# Altium PCB PCB1.PcbDoc (part 1 of 2)
Units mm, origin at the board's own origin, x right, y up, seen from the top; angles counter-clockwise.
Board outline 313.69 x 191.13 mm, 2 copper layers (Top Layer, Bottom Layer), stack 1.535 mm thick; 91 components, 77 nets, 316 pads, 51 vias.
Unrouted connection lines stored in the file: 30.
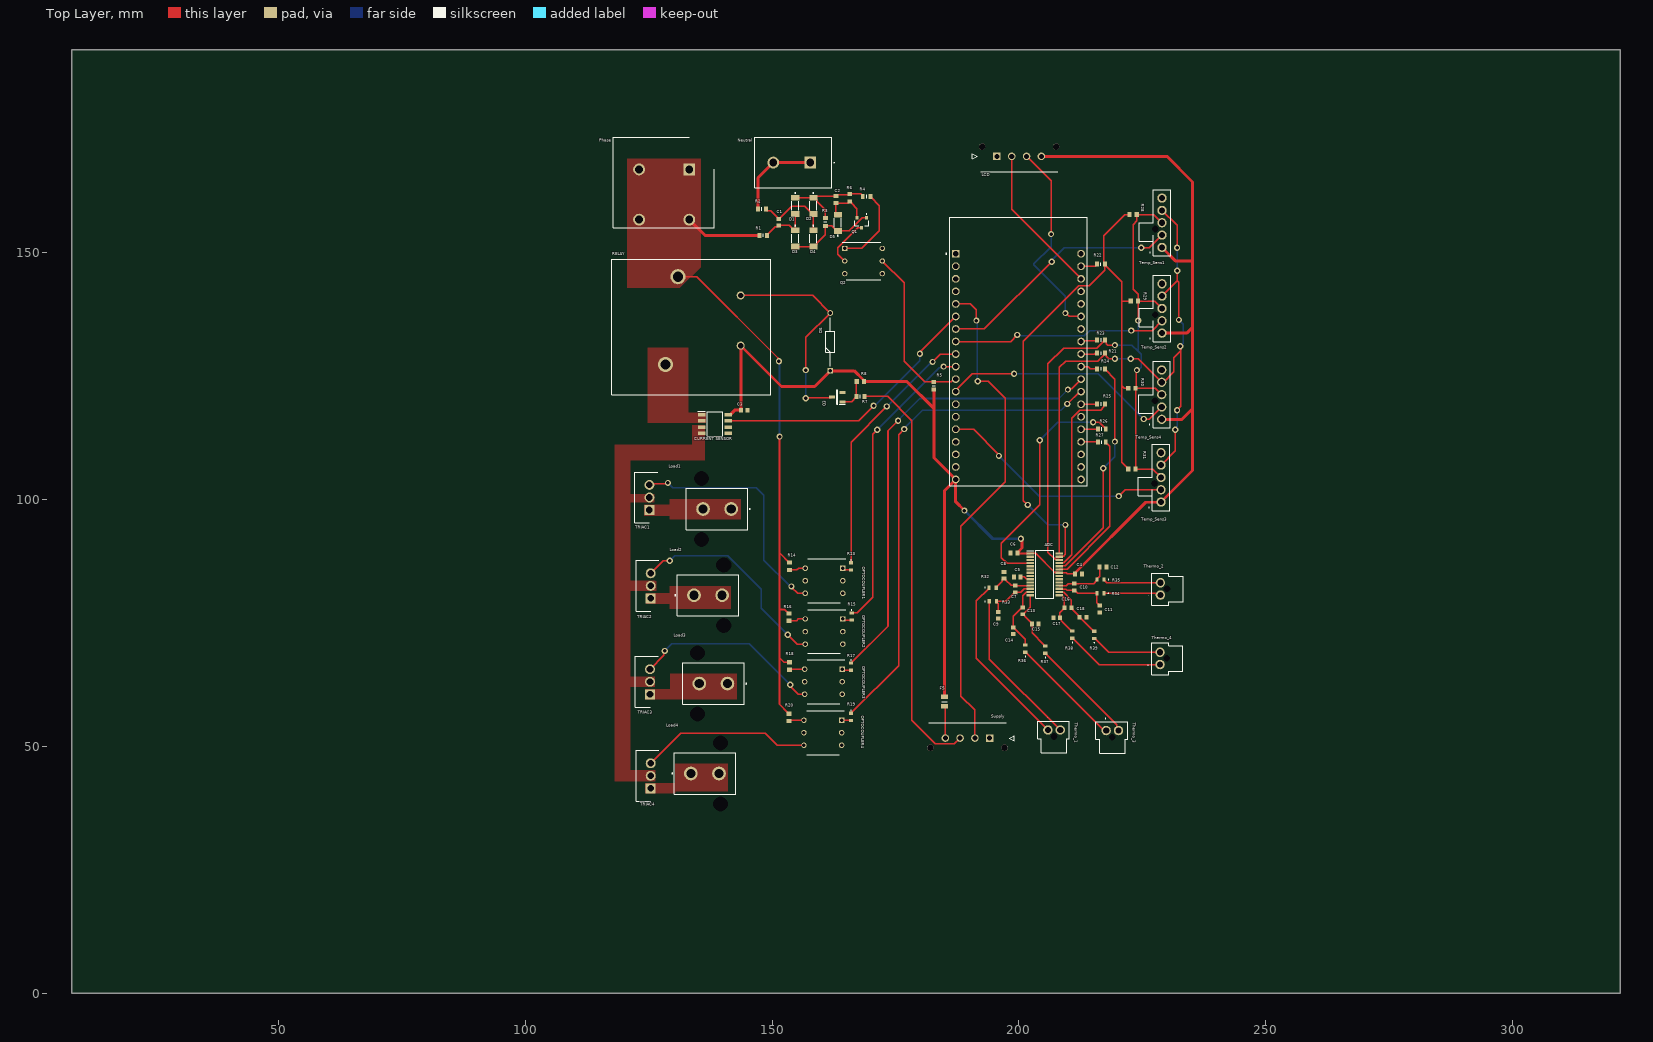
[diagram p0: Top Layer view]
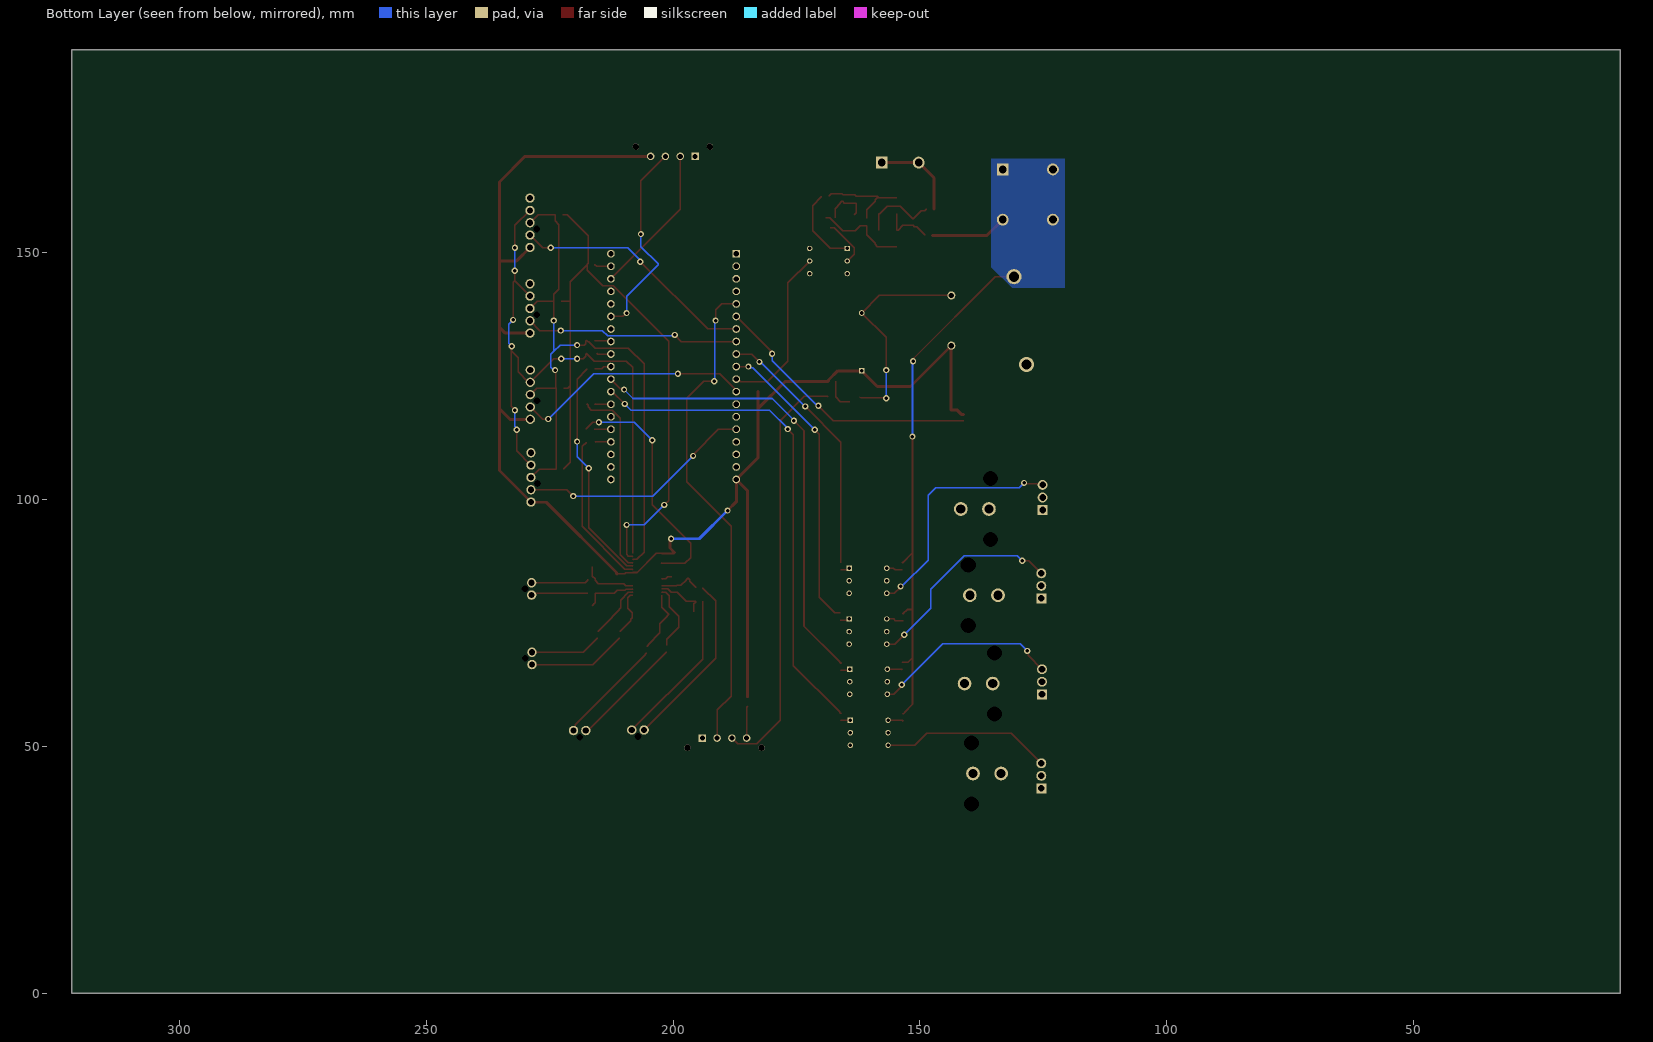
[diagram p1: Bottom Layer view, seen from below]

## Layer stack, top to bottom
Top Solder: solder mask 0.0102, Solder Resist, Dk 3.5
Top Layer: signal copper 0.035
Dielectric 2: prepreg 0.2, PP-006, Dk 4.6
Dielectric 1: core 1.065, FR-4, Dk 4.6
Dielectric 3: prepreg 0.2, PP-006, Dk 4.6
Bottom Layer: signal copper 0.035
Bottom Solder: solder mask 0.0102, Solder Resist, Dk 3.5

## Board outline
8.128,0 8.128,191.135 321.818,191.135 321.818,0

## Design rules (kind name [scope] priority, off if disabled: settings)
Clearance [All] p1: gap=0.2 ignorepadtopadclearanceinfootprint=FALSE except(0: Arc-Hole Track-Hole SMDPad-Hole THPad-Hole Via-Hole Fill-Hole Poly-Hole Region-Hole Text-Hole)
DiffPairsRouting [All] p1: maxlimit=1 minlimit=0.127 mostfreqgap=0.254 toplayer_minwidth=0.254 toplayer_maxwidth=0.381 toplayer_prefwidth=0.381 bottomlayer_minwidth=0.254 bottomlayer_maxwidth=0.381 bottomlayer_prefwidth=0.381 maxuncoupledlength=12.7
Height [All] p1: minheight=0 maxheight=35.4 prefheight=12.7
HoleSize [All] p1: absolutevalues=TRUE maxlimit=6 minlimit=0.025 maxpercent=80.000 minpercent=20.000
MinimumSolderMaskSliver [All] p1: minsoldermaskwidth=0.1
PolygonConnect [All] p1: connectstyle=Direct reliefconductorwidth=0.254 reliefentries=4 polygonreliefangle="90 Angle" airgapwidth=0.254
RoutingVias [All] p1: holewidth=0.711 width=1.27 viastyle="Through Hole" minholewidth=0.15 minwidth=0.25 maxholewidth=0.711 maxwidth=1.27
SilkToSilkClearance [All] p1: silktosilkclearance=0.15
SilkToSolderMaskClearance [IsPad] p1: minsilkscreentomaskgap=0.15 clearancetoexposedcopper=TRUE
SolderMaskExpansion SolderMaskExpansion_Via [IsVia] p1: expansion=0.102 istentingtop=TRUE
SolderMaskExpansion [All] p2: expansion=0.038 istentingtop=FALSE
SupplyNets "Schematic Supply Nets_50" [InNet('Trigger1')] p1: voltage=0.000
SupplyNets "Schematic Supply Nets_49" [InNet('Load2')] p2: voltage=0.000
SupplyNets "Schematic Supply Nets_48" [InNet('Firing Pulse 2')] p3: voltage=0.000
SupplyNets "Schematic Supply Nets_47" [InNet('Thermocouple3+')] p4: voltage=0.000
SupplyNets "Schematic Supply Nets_46" [InNet('DRDY')] p5: voltage=0.000
SupplyNets "Schematic Supply Nets_45" [InNet('SDA')] p6: voltage=0.000
SupplyNets "Schematic Supply Nets_44" [InNet('Phase')] p7: voltage=0.000
SupplyNets "Schematic Supply Nets_43" [InNet('CS_1')] p8: voltage=0.000
SupplyNets "Schematic Supply Nets_42" [InNet('Zero Cross Detection')] p9: voltage=0.000
SupplyNets "Schematic Supply Nets_41" [InNet('Firing Pulse 3')] p10: voltage=0.000
SupplyNets "Schematic Supply Nets_40" [InNet('Thermocouple3_IN+')] p11: voltage=0.000
SupplyNets "Schematic Supply Nets_39" [InNet('Thermocouple1+')] p12: voltage=0.000
SupplyNets "Schematic Supply Nets_38" [InNet('GND')] p13: voltage=0.000
SupplyNets "Schematic Supply Nets_37" [InNet('Thermocouple1_IN+')] p14: voltage=0.000
SupplyNets "Schematic Supply Nets_36" [InNet('Thermocouple2-')] p15: voltage=0.000
SupplyNets "Schematic Supply Nets_35" [InNet('Load4')] p16: voltage=0.000
SupplyNets "Schematic Supply Nets_34" [InNet('Phase_Out')] p17: voltage=0.000
SupplyNets "Schematic Supply Nets_33" [InNet('Thermocouple1_IN-')] p18: voltage=0.000
SupplyNets "Schematic Supply Nets_32" [InNet('DOUT')] p19: voltage=0.000
SupplyNets "Schematic Supply Nets_31" [InNet('Thermocouple4_IN+')] p20: voltage=0.000
SupplyNets "Schematic Supply Nets_30" [InNet('Thermocouple4_IN-')] p21: voltage=0.000
SupplyNets "Schematic Supply Nets_29" [InNet('Thermocouple2_IN-')] p22: voltage=0.000
SupplyNets "Schematic Supply Nets_28" [InNet('Firing Pulse 1')] p23: voltage=0.000
SupplyNets "Schematic Supply Nets_27" [InNet('Thermocouple3-')] p24: voltage=0.000
SupplyNets "Schematic Supply Nets_26" [InNet('Thermocouple3_IN-')] p25: voltage=0.000
SupplyNets "Schematic Supply Nets_25" [InNet('Thermocouple2+')] p26: voltage=0.000
SupplyNets "Schematic Supply Nets_24" [InNet('CS_ADC')] p27: voltage=0.000
SupplyNets "Schematic Supply Nets_23" [InNet('Neutral')] p28: voltage=0.000
SupplyNets "Schematic Supply Nets_22" [InNet('Trigger2')] p29: voltage=0.000
SupplyNets "Schematic Supply Nets_21" [InNet('SCLK')] p30: voltage=0.000
SupplyNets "Schematic Supply Nets_20" [InNet('Current Detection')] p31: voltage=0.000
SupplyNets "Schematic Supply Nets_19" [InNet('Thermocouple1-')] p32: voltage=0.000
SupplyNets "Schematic Supply Nets_18" [InNet('CS_3')] p33: voltage=0.000
SupplyNets "Schematic Supply Nets_17" [InNet('Relay_Trigger')] p34: voltage=0.000
SupplyNets "Schematic Supply Nets_16" [InNet('RESET')] p35: voltage=0.000
SupplyNets "Schematic Supply Nets_15" [InNet('Load1')] p36: voltage=0.000
SupplyNets "Schematic Supply Nets_14" [InNet('CS_2')] p37: voltage=0.000
SupplyNets "Schematic Supply Nets_13" [InNet('Thermocouple4-')] p38: voltage=0.000
SupplyNets "Schematic Supply Nets_12" [InNet('START')] p39: voltage=0.000
SupplyNets "Schematic Supply Nets_11" [InNet('Potentiometer')] p40: voltage=0.000
SupplyNets "Schematic Supply Nets_10" [InNet('CS_4')] p41: voltage=0.000
SupplyNets "Schematic Supply Nets_9" [InNet('Firing Pulse 4')] p42: voltage=0.000
SupplyNets "Schematic Supply Nets_8" [InNet('RELAY_OUT')] p43: voltage=0.000
SupplyNets "Schematic Supply Nets_7" [InNet('SCL')] p44: voltage=0.000
SupplyNets "Schematic Supply Nets_6" [InNet('+5')] p45: voltage=0.000
SupplyNets "Schematic Supply Nets_5" [InNet('Thermocouple4+')] p46: voltage=0.000
SupplyNets "Schematic Supply Nets_4" [InNet('DIN')] p47: voltage=0.000
SupplyNets "Schematic Supply Nets_3" [InNet('Thermocouple2_IN+')] p48: voltage=0.000
SupplyNets "Schematic Supply Nets_2" [InNet('Load3')] p49: voltage=0.000
SupplyNets "Schematic Supply Nets_1" [InNet('Trigger4')] p50: voltage=0.000
SupplyNets "Schematic Supply Nets" [InNet('Trigger3')] p51: voltage=0.000
Width [All] p1: maxlimit=6 minlimit=0.127 preferedwidth=0.254 minimp=50.000000 maximp=50.000000 favimp=50.000000
24 further rules are at their usual default settings.

## Classes and differential pairs
component class Sheet1: ADC C1 C2 C3 C4 C5 C6 C7 C8 C9 C10 C11 C12 C13 C14 C15 C16 C17 C18 "CURRENT SENSOR" D1 D2 D3 D4 D5 D6 F5 LCD Load1 Load2 Load3 Load4 Neutral OPTOCOUPLER1 OPTOCOUPLER2 OPTOCOUPLER3 OPTOCOUPLER4 Phase Q1 Q2 Q3 R1 R2 R3 R4 R6 R7 R8 R13 R14 R15 R16 R17 R18 R19 R20 R21 R22 R23 R24 R25 R26 R27 R28 R29 R30 R31 R32 R33 R34 R35 R36 R37 R38 R39 RELAY Supply Temp_Sens1 Temp_Sens2 Temp_Sens3 Temp_Sens4 Thermo_1 Thermo_2 Thermo_3 Thermo_4

## Components (designator, comment, footprint, x,y, rotation, side; value= is the part's Value field where it differs from the comment)
ADC "ADS1148IPWR" SOP65P640X120-28N 205.249,84.862 r0 top
C1 "1n" CAPC1608X90N 151.384,156.21 r90 top
C2 "10u" CAPC1608X102N 162.941,160.782 r270 top
C3 "1u" CAPC1608X90N 144.399,118.11 r0 top
C4 "0.1u" CAPC1608X95N 212.09,84.963 r0 top
C5 "1u" CAPC1608X90N 199.644,84.328 r180 top
C6 "0.1u" CAPC1608X95N 199.009,89.154 r180 top
C7 "10n" CAPC1608X87N 199.263,81.915 r270 top
C8 "1n" CAPC1608X90N 196.977,84.709 r90 top
C9 "1n" CAPC1608X90N 195.834,76.581 r270 top
C10 "10n" CAPC1608X87N 211.201,82.296 r90 top
C11 "1n" CAPC1608X90N 216.408,77.851 r270 top
C12 "1n" CAPC1608X90N 217.043,86.36 r0 top
C13 "10n" CAPC1608X87N 200.787,77.47 r270 top
C14 "1n" CAPC1608X90N 198.882,73.406 r270 top
C15 "1n" CAPC1608X90N 203.327,74.803 r0 top
C16 "10n" CAPC1608X87N 209.931,78.105 r0 top
C17 "1n" CAPC1608X90N 207.645,76.073 r180 top
C18 "1n" CAPC1608X90N 212.979,76.2 r0 top
"CURRENT SENSOR" "MCS1803GS-05-P" SOIC127P600X175-8N 138.43,115.316 r0 top
D1 "FDLL4148" FDLL4448 154.686,159.512 r270 top
D2 "FDLL4148" FDLL4448 158.369,159.512 r270 top
D3 "FDLL4148" FDLL4448 154.686,152.908 r270 top
D4 "FDLL4148" FDLL4448 158.369,152.908 r270 top
D5 "FDLL4148" FDLL4448 163.322,156.082 r90 top
D6 "1N4148,133" DIOAD1165W56L425D185 161.798,126.095 r90 top
F5 "1A" FUSC2012X55N 184.912,59.101 r270 top
LCD "43650-0417" 43650-04YY_151617 195.549,169.545 r180 top
Load1 "76829-0002" 768290002 141.717,98.1 r90 top
Load2 "76829-0002" 768290002 134.183,80.627 r270 top
Load3 "76829-0002" 768290002 140.955,62.738 r90 top
Load4 "76829-0002" 768290002 133.548,44.524 r270 top
Neutral "TB004-750-02GR" TB00475002GR 157.741,168.275 r180 top
OPTOCOUPLER1 "MOC3073M" DIP762W51P254L851H508Q6N 160.528,83.566 r180 top
OPTOCOUPLER2 "MOC3073M" DIP762W51P254L851H508Q6N 160.528,73.279 r180 top
OPTOCOUPLER3 "MOC3073M" DIP762W51P254L851H508Q6N 160.401,63.119 r180 top
OPTOCOUPLER4 "MOC3073M" DIP762W51P254L851H508Q6N 160.274,52.782 r180 top
Phase "VP026584000AG" SHDR4W100P1016_2X2_2032X1830X2850P 133.223,166.878 r180 top
Q1 "BC847,215" BC847215 168.148,156.083 r180 top
Q2 "4N35" DIP762W50P254L712H450Q6N 168.529,148.336 r0 top
Q3 "NVR4003NT3G" SOT96P237X111-3N 163.195,120.777 r180 top
R1 "220K" RESC1608X55N 148.209,153.543 r0 top
R2 "220K" RESC1608X55N 147.955,158.877 r0 top
R3 "47K" RESC1608X55N 160.782,156.248 r270 top
R4 "1K" RESC1608X55N 169.164,161.417 r0 top
R5 "4.7K" RESC1608X55N 182.753,123.063 r90 top
R6 "10K" RESC1608X50N 165.735,161.163 r270 top
R7 "1K" RESC1608X55N 167.894,120.904 r180 top
R8 "10K" RESC1608X50N 167.894,123.952 r180 top
R13 "200" ERA3AEB101V 165.989,86.487 r270 top
R14 "120" RESC1608X50N 153.543,86.499 r90 top
R15 "200" ERA3AEB101V 166.116,76.327 r270 top
R16 "120" RESC1608X50N 153.416,76.2 r90 top
R17 "200" ERA3AEB101V 165.989,66.167 r270 top
R18 "120" RESC1608X50N 153.543,66.294 r90 top
R19 "200" ERA3AEB101V 165.989,56.007 r270 top
R20 "120" RESC1608X50N 153.416,55.88 r90 top
R21 "47" RESC1608X55N 216.662,129.667 r0 top
R22 "47" RESC1608X55N 216.624,147.701 r0 top
R23 "47" RESC1608X55N 216.662,132.334 r0 top
R24 "47" RESC1608X55N 216.662,126.492 r0 top
R25 "47" RESC1608X55N 216.662,119.38 r0 top
R26 "47" RESC1608X55N 216.789,114.3 r0 top
R27 "47" RESC1608X55N 216.789,111.633 r0 top
R28 "10K" RESC1608X50N 223.139,157.734 r180 top
R29 "10K" RESC1608X50N 223.393,140.208 r180 top
R30 "10K" RESC1608X50N 222.885,122.555 r180 top
R31 "10K" RESC1608X50N 222.885,106.172 r180 top
R32 "4.12K" ERJP03_PA3_(0603) 194.691,82.169 r0 top
R33 "4.12K" ERJP03_PA3_(0603) 194.728,79.375 r0 top
R34 "4.12K" ERJP03_PA3_(0603) 216.535,81.026 r180 top
R35 "4.12K" ERJP03_PA3_(0603) 216.535,83.82 r180 top
R36 "4.12K" ERJP03_PA3_(0603) 201.295,69.813 r90 top
R37 "4.12K" ERJP03_PA3_(0603) 205.359,69.596 r90 top
R38 "4.12K" ERJP03_PA3_(0603) 210.82,72.644 r90 top
R39 "4.12K" ERJP03_PA3_(0603) 215.265,72.607 r90 top
RELAY "PR27-5V-S-900-1A-EF" RELAY_PR27-5V-S-900-1A-EF 128.397,127.381 r270 top
Supply "43650-0417" 43650-04YY_151617 194.087,51.689 r0 top
Temp_Sens1 "105309-1105" 1053091105 228.981,151.083 r90 top
Temp_Sens2 "105309-1105" 1053091105 228.981,133.724 r90 top
Temp_Sens3 "105309-1105" 1053091105 228.797,99.501 r90 top
Temp_Sens4 "105309-1105" 1053091105 228.924,116.265 r90 top
Thermo_1 "105309-1102" 1053091102 205.867,53.34 r0 top
Thermo_2 "105309-1102" 1053091102 228.657,80.665 r90 top
Thermo_3 "105309-1102" 1053091102 217.678,53.213 r0 top
Thermo_4 "105309-1102" 1053091102 228.6,66.588 r90 top
TRIAC1 "BT139X-800,127" TO254P460X1000X1910-3P 125.151,97.899 r90 top
TRIAC2 "BT139X-800,127" TO254P460X1000X1910-3P 125.405,79.992 r90 top
TRIAC3 "BT139X-800,127" TO254P460X1000X1910-3P 125.278,60.561 r90 top
TRIAC4 "BT139X-800,127" TO254P460X1000X1910-3P 125.405,41.511 r90 top
? "ESP32-DEVKITC-32D" MODULE_ESP32-DEVKITC-32D 199.898,130.048 r0 top

## Footprints (in the part's own frame and the unit in brackets; to place one, negate y for a bottom-side part, rotate by r counter-clockwise, add the part's x,y. Pads: shape width x height; smd on the part's side, far side on the other; paste and mask are expansions set on the pad)
43650-04YY_151617 [mm]
  rect 1.52x1.52 hole 1.02: 1(0,0)
  round 1.52 hole 1.02: 2(-3,0) 3(-6,0) 4(-9,0)
  round 1.27 hole 1.27 unplated: 5(3,-1.96) 6(-12,-1.96)
  silkscreen extent -12.32,-0.5 5,3.1, body extent -12.21,-2.46 3.44,3.15, height 9.77
768290002 [mm]
  round 2.775 hole 1.85: 1(0,0) 2(0,5.7)
  round 1.525 hole 3.05 unplated: MH1(-6.17,6.025) MH2(6.17,6.025)
  silkscreen extent -4.18,-3.9 4.18,9.09, body extent -7.7,-3.21 7.7,10.82, height 14.67
1053091102 [mm]
  round 1.9 hole 1.25: 1(0,0) 2(2.5,0)
  round 0.675 hole 1.35 unplated: 3(1.25,-1.34)
  silkscreen extent -2.08,-4.6 4.37,2.48, body extent -1.66,-4.6 4.28,1.74, height 10.47
1053091105 [mm]
  round 1.875 hole 1.25: 1(0,0) 2(2.5,0) 3(5,0) 4(7.5,0) 5(10,0)
  round 0.675 hole 1.35 unplated: MH1(3.75,1.34)
  silkscreen extent -1.72,-1.74 11.72,4.6, body extent -1.72,-4.6 11.72,1.74, height 10.39
BC847215 [mm]
  rect 0.6x0.7 smd: 1(-0.95,-1) 2(0.95,-1) 3(0,1)
  silkscreen extent -1.45,-1.8 1.45,0.65, body extent -1.45,-1.2 1.45,1.2, height 0.95
CAPC1608X87N [mm]
  rect 0.78x0.98 smd: 1(-0.7,0) 2(0.7,0)
  body extent -0.87,-0.48 0.88,0.47, height 0.87
CAPC1608X90N [mm]
  rect 0.81x0.94 smd: 1(-0.67,0) 2(0.67,0)
  body extent -0.8,-0.4 0.8,0.4, height 0.9
CAPC1608X95N [mm]
  rect 0.78x0.98 smd: 1(-0.7,0) 2(0.7,0)
  body extent -0.87,-0.48 0.88,0.47, height 0.87
CAPC1608X102N [mm]
  rect 0.82x1.02 smd: 1(-0.7,0) 2(0.7,0)
  body extent -0.8,-0.4 0.8,0.4, height 1.02
DIOAD1165W56L425D185 [mm]
  rect 1.15x1.15 hole 0.75: 1(0,0)
  round 1.15 hole 0.75: 2(11.7,0)
  silkscreen extent 0.92,-0.92 10.78,0.92, body extent 0.96,1.69 2.67,3.39, height 32.04
DIP762W50P254L712H450Q6N [mm]
  rect 1.1x1.1 hole 0.7: 1(-3.81,2.54)
  round 1.1 hole 0.7: 2(-3.81,0) 3(-3.81,-2.54) 4(3.81,-2.54) 5(3.81,0) 6(3.81,2.54)
  silkscreen extent -4.36,-3.81 3.5,3.81, body extent -3.94,-3.56 3.94,3.56, height 4.5
DIP762W51P254L851H508Q6N [mm]
  rect 1.11x1.11 hole 0.71: 1(-3.81,-2.54)
  round 1.11 hole 0.71: 2(-3.81,0) 3(-3.81,2.54) 4(3.81,2.54) 5(3.81,0) 6(3.81,-2.54)
  silkscreen extent -4.37,-4.45 3.3,4.45, body extent -3.94,-4.26 3.94,4.26, height 5.08
ERA3AEB101V [mm]
  rect 0.65x0.9 smd: 1(-0.725,0) 2(0.725,0)
  silkscreen extent -1.35,-0.05 -1.25,0.05, body extent -0.8,-0.4 0.8,0.4, height 0.45
ERJP03_PA3_(0603) [mm]
  rect 0.65x0.9 smd: 1(-0.725,0) 2(0.725,0)
  silkscreen extent -1.62,-0.05 -1.53,0.05, body extent -0.8,-0.4 0.8,0.4, height 0.45
FDLL4448 [mm]
  rect 1.15x1.65 smd: 1(-1.65,0) 2(1.65,0)
  silkscreen extent -2.7,-0.7 0.9,0.7, body extent -1.88,-0.74 1.72,0.74, height 1.5
FUSC2012X55N [mm]
  rect 0.89x1.42 smd: 1(-0.97,0) 2(0.97,0)
  silkscreen extent 0,-0.53 0,0.53, body extent -1,-0.63 1,0.63, height 0.55
MODULE_ESP32-DEVKITC-32D [mm]
  rect 1.56x1.56 / inner round 1.56 / far side rect 1.56x1.56 hole 1.04: J2-1(-12.7,19.76)
  round 1.56 hole 1.04: J2-2(-12.7,17.22) J2-3(-12.7,14.68) J2-4(-12.7,12.14) J2-5(-12.7,9.6) J2-6(-12.7,7.06) J2-7(-12.7,4.52) J2-8(-12.7,1.98) J2-9(-12.7,-0.56) J2-10(-12.7,-3.1) J2-11(-12.7,-5.64) J2-12(-12.7,-8.18) J2-13(-12.7,-10.72) J2-14(-12.7,-13.26) J2-15(-12.7,-15.8) J2-16(-12.7,-18.34) J2-17(-12.7,-20.88) J2-18(-12.7,-23.42) J2-19(-12.7,-25.96) J3-1(12.7,19.76) J3-2(12.7,17.22) J3-3(12.7,14.68) J3-4(12.7,12.14) J3-5(12.7,9.6) J3-6(12.7,7.06) J3-7(12.7,4.52) J3-8(12.7,1.98) J3-9(12.7,-0.56) J3-10(12.7,-3.1) J3-11(12.7,-5.64) J3-12(12.7,-8.18) J3-13(12.7,-10.72) J3-14(12.7,-13.26) J3-15(12.7,-15.8) J3-16(12.7,-18.34) J3-17(12.7,-20.88) J3-18(12.7,-23.42) J3-19(12.7,-25.96)
  silkscreen extent -14.7,-27.25 13.95,27.15, body extent -13.97,-27.9 13.97,27.2, height 6.69
RELAY_PR27-5V-S-900-1A-EF [mm]
  round 1.635 hole 1.09: COIL1(-13.97,15.24) COIL2(-3.81,15.24)
  round 3.076 hole 2.06: COM(-17.78,2.54) NO(0,0)
  silkscreen extent -21.3,-10.92 6.1,21.31
RESC1608X50N [mm]
  rect 0.85x1 smd: 1(-0.75,0) 2(0.75,0)
  body extent -0.77,-0.43 0.78,0.42, height 0.45
RESC1608X55N [mm]
  rect 0.8x1 smd: 1(-0.8,0) 2(0.8,0)
  silkscreen extent 0,-0.33 0,0.33, body extent -0.77,-0.42 0.78,0.43, height 0.45
SHDR4W100P1016_2X2_2032X1830X2850P [mm]
  rect 2.4x2.4 hole 1.6: 1(0,0)
  round 2.4 hole 1.6: 2(0,10.16) 3(10.16,0) 4(10.16,10.16)
  silkscreen extent -5.08,-6.54 15.39,11.76, body extent -5.08,-6.54 15.24,11.76, height 28.5
SOIC127P600X175-8N [mm]
  rect 1.525x0.7 smd: 1(-2.712,1.905) 2(-2.712,0.635) 3(-2.712,-0.635) 4(-2.712,-1.905) 5(2.712,-1.905) 6(2.712,-0.635) 7(2.712,0.635) 8(2.712,1.905)
  silkscreen extent -3.47,-2.45 1.6,2.61, body extent -3,-2.45 3,2.45, height 1.75
SOP65P640X120-28N [mm]
  rect 1.475x0.45 smd: 1(-2.938,4.225) 2(-2.938,3.575) 3(-2.938,2.925) 4(-2.938,2.275) 5(-2.938,1.625) 6(-2.938,0.975) 7(-2.938,0.325) 8(-2.938,-0.325) 9(-2.938,-0.975) 10(-2.938,-1.625) 11(-2.938,-2.275) 12(-2.938,-2.925) 13(-2.938,-3.575) 14(-2.938,-4.225) 15(2.938,-4.225) 16(2.938,-3.575) 17(2.938,-2.925) 18(2.938,-2.275) 19(2.938,-1.625) 20(2.938,-0.975) 21(2.938,-0.325) 22(2.938,0.325) 23(2.938,0.975) 24(2.938,1.625) 25(2.938,2.275) 26(2.938,2.925) 27(2.938,3.575) 28(2.938,4.225)
  silkscreen extent -3.67,-4.85 1.85,4.85, body extent -3.2,-4.85 3.2,4.85, height 1.13
SOT96P237X111-3N [mm]
  rect 1.25x0.6 smd: 1(-1.05,0.955) 2(-1.05,-0.955) 3(1.05,0)
  silkscreen extent -1.68,-1.46 0.08,1.51, body extent -1.18,-1.46 1.18,1.46, height 1.11
TB00475002GR [mm]
  rect 2.4x2.4 hole 1.6: 1(0,0)
  round 2.4 hole 1.6: 2(7.5,0)
  silkscreen extent -4.9,-5.1 11.25,5.1, body extent -4.35,-5.1 11.25,5.1, height 14.6
TO254P460X1000X1910-3P [mm]
  rect 2.01x2.01 hole 1.34: 1(0,0)
  round 2.01 hole 1.34: 2(2.54,0) 3(5.08,0)
  silkscreen extent -2.61,-1.65 7.69,2.95, body extent -2.46,-1.65 7.54,2.95, height 18.54

## Part data
ADC: "Integrated Circuit", Manufacturer_Name="Texas Instruments", Mouser Part Number=595-ADS1148IPWR, Arrow Part Number=ADS1148IPWR, Arrow Price/Stock=https://www.arrow.com/en/products/ads1148ipwr/texas-instruments, Datasheet Link=https://www.ti.com/lit/ds/symlink/ads1148.pdf?ts=1619426241250&ref_url=https%253A%252F%252Fwww.ti.com%252Fstore%252Fti%252Fen%252Fp%252Fproduct%252F%253Fp%253DADS1148IPWR, Height=1.2mm, Manufacturer_Part_Number=ADS1148IPWR, Mouser Price/Stock=https://www.mouser.co.uk/ProductDetail/Texas-Instruments/ADS1148IPWR?qs=J7dbQ%252BTwiys0xPZTIiVXvA%3D%3D
C1 C8 C9 C11 C12 C14 C15 C17 C18: library part GRM188R72E102KW07D, "Capacitor", Manufacturer_Name="Murata Electronics", Mouser Part Number=81-GRM18R72E102KW07D, Arrow Part Number=GRM188R72E102KW07D, Arrow Price/Stock=https://www.arrow.com/en/products/grm188r72e102kw07d/murata-manufacturing, Datasheet Link=https://search.murata.co.jp/Ceramy/image/img/A01X/G101/ENG/GRM188R72E102KW07-00B.pdf, Height=0.9mm, Manufacturer_Part_Number=GRM188R72E102KW07D, Mouser Price/Stock=https://www.mouser.co.uk/ProductDetail/Murata-Electronics/GRM188R72E102KW07D?qs=0EDxBdtd5TTqBbAL3ZuZjw%3D%3D
C2: library part 0603YD106KAT2A, "Capacitor", Manufacturer_Name="Kyocera AVX", Mouser Part Number=581-0603YD106KAT2A, Datasheet Link=https://www.mouser.at/datasheet/2/40/cx5r-776519.pdf, Height=1.02mm, Manufacturer_Part_Number=0603YD106KAT2A, Mouser Price/Stock=https://www.mouser.co.uk/ProductDetail/KYOCERA-AVX/0603YD106KAT2A?qs=%252BdQmOuGyFcHR%252BKJjw6cgxw%3D%3D
C3 C5: library part MSASE168SB7105KTNA01, "Capacitor", Manufacturer_Name="TAIYO YUDEN", Mouser Part Number=963-MSASE168SB7105KT, Datasheet Link=https://ds.yuden.co.jp/TYCOMPAS/or/specSheet?pn=MSASE168SB7105KTNA01, Height=0.9mm, Manufacturer_Part_Number=MSASE168SB7105KTNA01, Mouser Price/Stock=https://www.mouser.co.uk/ProductDetail/TAIYO-YUDEN/MSASE168SB7105KTNA01?qs=tlsG%2FOw5FFh5ATmmYVDecQ%3D%3D
C4 C6: library part C0603C104K5RAC3121, "Capacitor", Manufacturer_Name=KEMET, Mouser Part Number=80-C603C104K5RAC3121, Arrow Part Number=C0603C104K5RAC3121, Arrow Price/Stock=https://www.arrow.com/en/products/c0603c104k5rac3121/kemet-corporation?region=nac, Datasheet Link=https://mouser.componentsearchengine.com/Datasheets/1/C0603C104K5RAC3121.pdf, Height=0.95mm, Manufacturer_Part_Number=C0603C104K5RAC3121, Mouser Price/Stock=https://www.mouser.co.uk/ProductDetail/KEMET/C0603C104K5RAC3121?qs=oBCMsStVSxe1EkGyoyETtg%3D%3D
C7 C10 C13 C16: library part C0603C103K5RAC7013, "Capacitor", Manufacturer_Name=KEMET, Mouser Part Number=80-C0603C103K5RC7013, Arrow Part Number=C0603C103K5RAC7013, Arrow Price/Stock=https://www.arrow.com/en/products/c0603c103k5rac7013/kemet-corporation, Datasheet Link=https://www.mouser.es/datasheet/2/212/KEM_C1002_X7R_SMD-1102033.pdf, Height=0.87mm, Manufacturer_Part_Number=C0603C103K5RAC7013, Mouser Price/Stock=https://www.mouser.co.uk/ProductDetail/KEMET/C0603C103K5RAC7013?qs=rxL5I1UrDR%2FDLdVRYcoJRw%3D%3D
"CURRENT SENSOR": "Integrated Circuit", Manufacturer_Name="Monolithic Power Systems (MPS)", Mouser Part Number=946-MCS1803GS-05-P, Datasheet Link=https://www.monolithicpower.com/en/documentview/productdocument/index/version/2/document_type/Datasheet/lang/en/sku/MCS1803GS/document_id/5067/, Height=1.75mm, Manufacturer_Part_Number=MCS1803GS-05-P, Mouser Price/Stock=https://www.mouser.co.uk/ProductDetail/Monolithic-Power-Systems-MPS/MCS1803GS-05-P?qs=GedFDFLaBXFKS0RaHM78Vw%3D%3D
D1 D2 D3 D4 D5: "Diode", Manufacturer_Name=onsemi, Mouser Part Number=512-FDLL4148, Arrow Part Number=FDLL4148, Arrow Price/Stock=https://www.arrow.com/en/products/fdll4148/on-semiconductor?utm_currency=USD&region=europe, Datasheet Link=https://www.onsemi.com/pub/Collateral/1N914-D.PDF, Height=1mm, Manufacturer_Part_Number=FDLL4148, Mouser Price/Stock=https://www.mouser.co.uk/ProductDetail/onsemi-Fairchild/FDLL4148?qs=GXJjH%252BIVz3Nb7%252BJnJig0Zw%3D%3D
D6: "Diode", Manufacturer_Name=Nexperia, Mouser Part Number=771-1N4148,133, Arrow Part Number=1N4148,133, Arrow Price/Stock=https://www.arrow.com/en/products/1n4148133/nxp-semiconductors, Datasheet Link=https://assets.nexperia.com/documents/data-sheet/1N4148_1N4448.pdf, Manufacturer_Part_Number=1N4148,133, Mouser Price/Stock=https://www.mouser.co.uk/ProductDetail/Nexperia/1N4148133?qs=elmhQ6eFu7hy8ApvpFxPZg%3D%3D
F5: library part MFU0805FF00500P100, "Fuse", Manufacturer_Name=Vishay, Mouser Part Number=594-MFU0805FF00500P1, Arrow Part Number=MFU0805FF00500P100, Arrow Price/Stock=https://www.arrow.com/en/products/mfu0805ff00500p100/vishay?region=nac, Datasheet Link=https://componentsearchengine.com/Datasheets/2/MFU0805FF00500P100.pdf, Height=0.55mm, Manufacturer_Part_Number=MFU0805FF00500P100, Mouser Price/Stock=https://www.mouser.co.uk/ProductDetail/Vishay-Beyschlag/MFU0805FF00500P100?qs=oI046glRuru%2F1tLHYz8V8Q%3D%3D
LCD Supply: "Connector", Manufacturer_Name=Molex, Mouser Part Number=538-43650-0417, Datasheet Link=https://www.molex.com/pdm_docs/sd/436500215_sd.pdf, Height=9.9mm, Manufacturer_Part_Number=43650-0417, Mouser Price/Stock=https://www.mouser.co.uk/ProductDetail/Molex/43650-0417?qs=HSGlLeu24BPtyyP0ZyQMkg%3D%3D
Load1 Load2 Load3 Load4: "Connector", Manufacturer_Name=Molex, Mouser Part Number=538-76829-0002, Datasheet Link=https://www.molex.com/pdm_docs/sd/768290002_sd.pdf, Height=14.8mm, Manufacturer_Part_Number=76829-0002, Mouser Price/Stock=https://www.mouser.co.uk/ProductDetail/Molex/76829-0002?qs=KpdAywxU013zSYApMD1zRg%3D%3D
Neutral: "Connector", Manufacturer_Name="Same Sky", Mouser Part Number=179-TB004-750-02GR, Datasheet Link=https://www.sameskydevices.com/product/resource/tb004-750.pdf?srsltid=AfmBOoqxp3TGb86M5ULA4E0wzZ60u_8h9TMDVLcLcvBMs9Tl5jQU3eIt, Height=14.5mm, Manufacturer_Part_Number=TB004-750-02GR, Mouser Price/Stock=https://www.mouser.co.uk/ProductDetail/Same-Sky/TB004-750-02GR?qs=%252BXxaIXUDbq2vyEQ2cptGkg%3D%3D
OPTOCOUPLER1 OPTOCOUPLER2 OPTOCOUPLER3 OPTOCOUPLER4: "Phototransistor", Manufacturer_Name=onsemi, Mouser Part Number=863-MOC3073M, Arrow Part Number=MOC3073M, Arrow Price/Stock=https://www.arrow.com/en/products/moc3073m/on-semiconductor, Datasheet Link=https://www.onsemi.com/pub/Collateral/MOC3072M-D.PDF, Height=5.08mm, Manufacturer_Part_Number=MOC3073M, Mouser Price/Stock=https://www.mouser.co.uk/ProductDetail/onsemi/MOC3073M?qs=y6ZabgHbY%252Byfe0V2Rxk3CA%3D%3D
Phase: "Connector", Manufacturer_Name=Amphenol, Mouser Part Number=523-VP026584000AG, Datasheet Link=http://www.anytek.com.tw/UserUpFiles/20181025/d41_CP3hmn_a.pdf, Height=28.5mm, Manufacturer_Part_Number=VP026584000AG, Mouser Price/Stock=https://www.mouser.co.uk/ProductDetail/Amphenol-Anytek/VP026584000AG?qs=T3oQrply3y8ZXElTBVt2Rg%3D%3D
Q1: "Transistor BJT NPN", Manufacturer_Name=Nexperia, Mouser Part Number=771-BC847215, Arrow Part Number=BC847,215, Arrow Price/Stock=https://www.arrow.com/en/products/bc847215/nexperia?region=europe, Datasheet Link=https://assets.nexperia.com/documents/data-sheet/BC847_SER.pdf, Height=1.1mm, Manufacturer_Part_Number=BC847,215, Mouser Price/Stock=https://www.mouser.co.uk/ProductDetail/Nexperia/BC847215?qs=me8TqzrmIYWROhdFmDauyQ%3D%3D
Q2: "Transistor", Manufacturer_Name=Isocom, Arrow Part Number=4N35, Arrow Price/Stock=https://www.arrow.com/en/products/4n35/isocom?region=nac, Datasheet Link=http://uk.rs-online.com/web/p/products/597302, Height=4.5mm, Manufacturer_Part_Number=4N35
Q3: "MOSFET (N-Channel)", Manufacturer_Name=onsemi, Mouser Part Number=863-NVR4003NT3G, Arrow Part Number=NVR4003NT3G, Arrow Price/Stock=https://www.arrow.com/en/products/nvr4003nt3g/on-semiconductor?region=nac, Datasheet Link=https://www.onsemi.com/pub/Collateral/NTR4003N-D.PDF, Height=1.11mm, Manufacturer_Part_Number=NVR4003NT3G, Mouser Price/Stock=https://www.mouser.co.uk/ProductDetail/onsemi/NVR4003NT3G?qs=3PKVEWFFm28eDxDv809Sag%3D%3D
R1 R2: library part MCT06030C2203FP500, "Resistor", Manufacturer_Name=Vishay, Mouser Part Number=594-MCT06030C2203FP5, Arrow Part Number=MCT06030C2203FP500, Arrow Price/Stock=https://www.arrow.com/en/products/mct06030c2203fp500/vishay?region=nac, Datasheet Link=http://www.vishay.com/docs/28705/mcx0x0xpro.pdf, Height=0.55mm, Manufacturer_Part_Number=MCT06030C2203FP500, Mouser Price/Stock=https://www.mouser.co.uk/ProductDetail/Vishay-Beyschlag/MCT06030C2203FP500?qs=sIxod1zg5hFqr3QuK7fi7g%3D%3D
R3: library part KTR03EZPF4702, "Resistor", Manufacturer_Name="ROHM Semiconductor", Mouser Part Number=755-KTR03EZPF4702, Datasheet Link=http://rohmfs.rohm.com/en/products/databook/datasheet/passive/resistor/chip_resistor/ktr.pdf, Height=0.55mm, Manufacturer_Part_Number=KTR03EZPF4702, Mouser Price/Stock=https://www.mouser.com/Search/Refine.aspx?Keyword=755-KTR03EZPF4702
R4 R7: library part CR0603-JW-102ELF, "Resistor", Manufacturer_Name=Bourns, Mouser Part Number=652-CR0603-JW-102ELF, Arrow Part Number=CR0603-JW-102ELF, Arrow Price/Stock=https://www.arrow.com/en/products/cr0603-jw-102elf/bourns?region=nac, Datasheet Link=https://www.bourns.com/pdfs/chpreztr.pdf, Height=0.55mm, Manufacturer_Part_Number=CR0603-JW-102ELF, Mouser Price/Stock=https://www.mouser.co.uk/ProductDetail/Bourns/CR0603-JW-102ELF?qs=rcPhh2wube3o3zlmFZCUPg%3D%3D
R5: library part ESR03EZPF4701, "Resistor", Manufacturer_Name="ROHM Semiconductor", Mouser Part Number=755-ESR03EZPF4701, Datasheet Link=http://uk.rs-online.com/web/p/products/1674382, Height=0.55mm, Manufacturer_Part_Number=ESR03EZPF4701, Mouser Price/Stock=https://www.mouser.co.uk/ProductDetail/ROHM-Semiconductor/ESR03EZPF4701?qs=493kPxzlxfL2NnaeJoZB2Q%3D%3D
R6 R8 R28 R29 R30 R31: library part CRCW060310K0FKEA, "Resistor", Manufacturer_Name=Vishay, Mouser Part Number=71-CRCW0603-10K-E3, Arrow Part Number=CRCW060310K0FKEA, Arrow Price/Stock=https://www.arrow.com/en/products/crcw060310k0fkea/vishay?region=nac, Datasheet Link=http://www.vishay.com/docs/20035/dcrcwe3.pdf, Height=0.5mm, Manufacturer_Part_Number=CRCW060310K0FKEA, Mouser Price/Stock=https://www.mouser.co.uk/ProductDetail/Vishay-Dale/CRCW060310K0FKEA?qs=pAO1Z172M84BVnhDjtnsoQ%3D%3D
R13 R15 R17 R19: library part ERA-3AEB201V, "Resistor", Manufacturer_Name=Panasonic, Mouser Part Number=667-ERA-3AEB201V, Arrow Part Number=ERA-3AEB201V, Arrow Price/Stock=https://www.arrow.com/en/products/era-3aeb201v/panasonic, Datasheet Link=https://industrial.panasonic.com/cdbs/www-data/pdf/RDM0000/AOA0000C307.pdf, Height=0.55mm, Manufacturer_Part_Number=ERA-3AEB201V, Mouser Price/Stock=https://www.mouser.co.uk/ProductDetail/Panasonic/ERA-3AEB201V?qs=XhO1W%252B5LdJ8wKRfVTWbMaA%3D%3D
R14 R16 R18 R20: library part CRCW0603120RJNEB, "Resistor", Manufacturer_Name=Vishay, Mouser Part Number=71-CRCW0603120RJNEB, Arrow Part Number=CRCW0603120RJNEB, Arrow Price/Stock=https://www.arrow.com/en/products/crcw0603120rjneb/vishay?region=nac, Datasheet Link=http://www.vishay.com/docs/20035/dcrcwe3.pdf, Height=0.5mm, Manufacturer_Part_Number=CRCW0603120RJNEB, Mouser Price/Stock=https://www.mouser.co.uk/ProductDetail/Vishay-Dale/CRCW0603120RJNEB?qs=dDPdN3Fizmtr%252Bd8kOFNKdA%3D%3D
R21 R22 R23 R24 R25 R26 R27: library part MCT06030C4709FP500, "Resistor", Manufacturer_Name=Vishay, Mouser Part Number=594-MCT06030C4709FP5, Datasheet Link=http://www.vishay.com/docs/28705/mcx0x0xpro.pdf, Height=0.55mm, Manufacturer_Part_Number=MCT06030C4709FP500, Mouser Price/Stock=https://www.mouser.co.uk/ProductDetail/Vishay-Beyschlag/MCT06030C4709FP500?qs=Vqeyrh6s%2FtGOVFMn1BdPQw%3D%3D
R32 R33 R34 R35 R36 R37 R38 R39: library part ERJ-PA3F4121V, "Resistor", Manufacturer_Name=Panasonic, Mouser Part Number=667-ERJ-PA3F4121V, Datasheet Link=https://industrial.panasonic.com/cdbs/www-data/pdf/RDO0000/AOA0000C331.pdf, Height=0.55mm, Manufacturer_Part_Number=ERJ-PA3F4121V, Mouser Price/Stock=https://www.mouser.com/Search/Refine.aspx?Keyword=667-ERJ-PA3F4121V
RELAY: Package=None, Availability=Unavailable, MP=PR27-5V-S-900-1A-EF, Price=None
Temp_Sens1 Temp_Sens2 Temp_Sens3 Temp_Sens4: "Connector", Manufacturer_Name=Molex, Mouser Part Number=538-105309-1105, Datasheet Link=https://componentsearchengine.com/Datasheets/1/105309-1105.pdf, Height=10.71mm, Manufacturer_Part_Number=105309-1105, Mouser Price/Stock=https://www.mouser.co.uk/ProductDetail/Molex/105309-1105?qs=5aG0NVq1C4xeVnIB0kAHNg%3D%3D
Thermo_1 Thermo_2 Thermo_3 Thermo_4: "Connector", Manufacturer_Name=Molex, Mouser Part Number=538-105309-1102, Datasheet Link=http://www.molex.com/pdm_docs/sd/1053091102_sd.pdf, Height=10.51mm, Manufacturer_Part_Number=105309-1102, Mouser Price/Stock=https://www.mouser.co.uk/ProductDetail/Molex/105309-1102?qs=5aG0NVq1C4zzTOxEjLJqtg%3D%3D
TRIAC1 TRIAC2 TRIAC3 TRIAC4: "Thermistor", Manufacturer_Name="WeEn Semiconductors", Mouser Part Number=771-BT139X-800127, Arrow Part Number=BT139X-800,127, Arrow Price/Stock=https://www.arrow.com/en/products/bt139x-800127/ween-semiconductors?utm_currency=USD&region=europe, Datasheet Link=https://www.mouser.co.uk/datasheet/2/848/BT139X-800-1104332.pdf, Height=4.6mm, Manufacturer_Part_Number=BT139X-800,127, Mouser Price/Stock=https://www.mouser.co.uk/ProductDetail/WeEn-Semiconductors/BT139X-800127?qs=me8TqzrmIYUpGZ3R%252BN0ixA%3D%3D
?: "WiFi Development Tools (802.11) ESP32 General Development Kit, ESP32-WROOM-32D on the board", Package=None, Check_prices=https://www.snapeda.com/parts/ESP32-DEVKITC-32D/Espressif+Systems/view-part/?ref=eda, MF="Espressif Systems", MP=ESP32-DEVKITC-32D, SnapEDA_Link=https://www.snapeda.com/parts/ESP32-DEVKITC-32D/Espressif+Systems/view-part/?ref=snap

## Via types
v1: diameter 1.27, hole 0.711, Top Layer to Bottom Layer, tented both sides, 51 vias

## Nets (pads, with @x,y where several pads share a name; then routed paths per layer and width w, separated by ;. In a path a pad name is that pad's centre, name@x,y a point inside that pad or via, vN(x,y) a via of type N, cw(c..) or ccw(c..) an arc to the next point about the centre after c; other vN are vias at no path point)
+5: "CURRENT SENSOR.8" ?.J2-19 ADC.1 ADC.22 C3.1 C4.1 C6.1 D6.1 F5.1 LCD.4 R5.1 R8.1 RELAY.COIL2 Temp_Sens1.1 Temp_Sens2.1 Temp_Sens3.1 Temp_Sens4.1 | length 310.3
  Top Layer w0.35: C6.1@199.709,89.254 C6.1 199.776,89.087 ADC.1 202.336,89.112 203.419,89.112 207.294,85.237 208.137,85.237 ADC.22 209.58,85.187 209.804,84.963 C4.1
  Top Layer w0.6: 141.142,117.221 141.554,117.221 141.605,117.271 141.605,117.291 142.424,118.11 C3.1 143.683,118.156 RELAY.COIL2@143.683,131.145 ; RELAY.COIL2 RELAY.COIL2@143.683,131.145 ; R5.1@182.753,121.92 182.753,118.491 ; F5.1 184.912,101.802 ?.J2-19 ; v1(188.976,97.79) 187.198,99.568 ?.J2-19 ; C6.1@199.709,89.254 200.648,90.193 200.648,91.652 200.406,91.894 v1(200.406,92.075) ; LCD.4 229.997,169.545 235.178,164.364 235.178,148.382 ; C4.1 211.48,85.053 211.48,85.24 225.707,99.467 Temp_Sens3.1@228.763,99.467 ; Temp_Sens3.1 235.178,105.882 235.178,118.41 ; Temp_Sens4.1 233.033,116.265 235.178,118.41 ; Temp_Sens2.1 233.982,133.724 235.178,134.92 ; Temp_Sens1.1 231.682,148.382 235.178,148.382 ; RELAY.COIL2@143.683,131.145 151.892,122.936 158.623,122.936 161.507,125.82 161.523,125.82 D6.1 166.633,126.095 168.519,124.209 168.519,124.077 R8.1 177.292,123.952 182.753,118.491 ; 182.753,118.491 182.753,108.533 ?.J2-19 ; 235.178,118.41 235.178,134.92 ; 235.178,134.92 235.178,148.382
  Bottom Layer w0.6: v1(188.976,97.79) 194.691,92.075 v1(200.406,92.075)
CS_1: ?.J2-7 Temp_Sens1.2 | length 49.8
  Top Layer w0.254: ?.J2-7 192.988,134.568 v1(206.629,148.209) ; v1(224.79,151.003) 226.401,151.003 Temp_Sens1.2
  Bottom Layer w0.254: v1(206.629,148.209) 206.629,148.463 209.169,151.003 v1(224.79,151.003)
CS_2: ?.J2-8 Temp_Sens2.2 | length 43.4
  Top Layer w0.254: ?.J2-8 198.322,132.028 v1(199.644,133.35) ; v1@223.012,134.239 226.996,134.239 Temp_Sens2.2
  Bottom Layer w0.254: v1(199.644,133.35) 199.771,133.223 213.286,133.223 214.302,134.239 v1(222.758,134.239)
CS_3: ?.J2-15 Temp_Sens3.2 | length 47.9
  Top Layer w0.254: ?.J2-15 187.236,114.211 190.843,114.211 195.961,109.093 v1(195.961,108.839) ; v1(220.218,100.711) 221.508,102.001 Temp_Sens3.2
  Bottom Layer w0.254: v1(195.961,108.839) 204.089,100.711 v1(220.218,100.711)
CS_4: ?.J2-12 Temp_Sens4.2 | length 48.3
  Top Layer w0.254: ?.J2-12 187.198,122.174 190.539,125.515 198.97,125.515 v1(199.009,125.476) ; v1(225.298,116.332) 225.348,116.282 226.441,116.282 Temp_Sens4.2
  Bottom Layer w0.254: v1(199.009,125.476) 199.048,125.515 216.115,125.515 v1(225.298,116.332)
CS_ADC: ADC.24 R24.2 | length 46.1
  Top Layer w0.254: ADC.24 208.285,86.585 209.394,86.585 217.106,94.297 v1(217.106,106.362) ; R24.2 217.462,126.392 219.456,124.398 v1(219.456,111.76)
  Bottom Layer w0.254: v1(217.106,106.362) 219.456,108.712 v1(219.456,111.76)
"Current Detection": "CURRENT SENSOR.7" ?.J2-6 | length 55.8
  Top Layer w0.254: 141.142,115.951 167.513,115.951 v1(170.561,118.999) ; v1(179.959,129.54) 179.959,129.815 180.259,130.115 180.259,130.169 ?.J2-6
  Bottom Layer w0.254: v1(170.561,118.999) 170.815,118.999 179.959,128.143 v1(179.959,129.54)
DIN: ADC.27 R22.2 R28.2 R29.2 R30.2 R31.2 | length 133.3
  Top Layer w0.254: v1(201.803,98.933) 200.914,99.822 200.914,132.07 212.139,143.295 214.21,143.295 217.424,146.509 R22.2@217.424,147.601 ; ADC.27 208.285,88.535 209.06,88.535 209.423,88.898 v1(209.423,94.869) ; R31.2 222.135,106.247 220.853,107.529 220.853,123.063 ; R30.2 221.361,122.555 220.853,123.063 ; R28.2 221.488,157.734 217.208,153.454 217.208,147.917 R22.2 R22.2@217.424,147.601 ; R29.2 220.853,140.208 ; R22.2@217.424,147.601 220.853,144.172 220.853,140.208 ; 220.853,123.063 220.853,140.208
  Bottom Layer w0.254: v1(201.803,98.933) 205.867,94.869 v1(209.423,94.869)
DOUT: ADC.26 R23.2 R28.1 R29.1 R30.1 R31.1 Temp_Sens1.3 Temp_Sens2.3 Temp_Sens3.3 Temp_Sens4.3 | length 138.8
  Top Layer w0.254: ADC.26 208.089,87.885 207.314,87.885 205.867,89.332 205.867,127.508 209.035,130.676 215.804,130.676 217.089,131.961 217.189,131.961 217.462,132.234 R23.2 217.735,132.061 217.735,131.553 217.97,131.318 v1(219.456,131.318) ; v1(223.901,126.238) 223.774,126.111 223.774,122.694 R30.1 ; v1(224.155,136.271) 224.155,140.196 R29.1 ; Temp_Sens3.3 227.126,106.172 R31.1 R30.1 ; Temp_Sens4.3 227.634,122.555 R30.1 ; Temp_Sens2.3 227.497,140.208 R29.1 ; Temp_Sens1.3 227.33,157.734 R28.1 223.889,156.452 223.139,155.702 223.139,142.621 224.143,141.617 R29.1
  Bottom Layer w0.254: v1(219.456,131.318) 222.885,131.318 224.155,130.048 ; v1(223.901,126.238) 224.176,126.238 224.79,126.852 224.79,129.413 224.155,130.048 ; v1(224.155,136.271) 224.155,130.048
DRDY: ADC.25 R25.2 | length 39
  Top Layer w0.254: ADC.25 208.285,87.235 209.06,87.235 210.693,88.868 210.693,116.449 212.371,118.127 216.552,118.127 217.189,118.764 217.189,119.107 R25.2
"Firing Pulse 1": ?.J2-9 R13.1 | length 53
  Top Layer w0.254: R13.1 165.989,111.633 v1(173.228,118.872) ; v1(182.499,127.889) 184.098,129.488 ?.J2-9
  Bottom Layer w0.254: v1(173.228,118.872) 173.355,118.872 182.372,127.889 v1(182.499,127.889)
"Firing Pulse 2": ?.J2-10 R15.1 | length 61.1
  Top Layer w0.254: R15.1 167.222,77.052 170.434,80.264 170.434,113.284 v1(171.323,114.173) ; v1(184.733,126.948) ?.J2-10
  Bottom Layer w0.254: v1(171.323,114.173) 183.904,126.754 184.539,126.754 v1(184.733,126.948)
"Firing Pulse 3": ?.J3-11 R17.1 | length 93.7
  Top Layer w0.35: R17.1 166.114,66.892 166.264,67.042 166.264,67.167 173.482,74.385 173.482,113.919 v1(175.514,115.951) ; v1(209.931,122.301) 210.107,122.477 210.667,122.477 ?.J3-11
  Bottom Layer w0.35: v1(175.514,115.951) 175.514,116.078 179.919,120.483 208.113,120.483 v1(209.931,122.301)
"Firing Pulse 4": ?.J3-12 R19.1 | length 101.1
  Top Layer w0.35: R19.1 166.114,56.732 166.264,56.882 166.264,57.007 175.641,66.384 175.641,113.157 v1(176.784,114.3) ; v1(209.804,119.38) 212.292,121.868 ?.J3-12
  Bottom Layer w0.35: v1(176.784,114.3) 176.784,114.427 180.467,118.11 208.534,118.11 v1(209.804,119.38)
GND: "CURRENT SENSOR.5" ?.J2-14 ADC.2 ADC.3 ADC.6 ADC.10 ADC.21 C3.2 C4.2 C5.2 C6.2 C8.2 C9.2 C11.2 C12.2 C14.2 C15.2 C17.2 C18.2 LCD.1 OPTOCOUPLER1.2 OPTOCOUPLER2.2 OPTOCOUPLER3.2 OPTOCOUPLER4.2 Q2.4 Q3.2 Supply.1 Temp_Sens1.5 Temp_Sens2.5 Temp_Sens3.5 Temp_Sens4.5
Load1: Load1.1 Load1.2 TRIAC1.1
Load2: Load2.1 Load2.2 TRIAC2.1
Load3: Load3.1 Load3.2 TRIAC3.1
Load4: Load4.1 Load4.2 TRIAC4.1
Net_J3-2: ?.J3-2 R22.1 | length 3.5
  Top Layer w0.254: ?.J3-2 215.491,147.268 215.824,147.601 R22.1
Net_J3-8: ?.J3-8 R23.1 | length 3.3
  Top Layer w0.35: ?.J3-8 212.751,132.181 R23.1@215.862,132.181
Net_J3-9: ?.J3-9 R21.1 | length 3
  Top Layer w0.254: ?.J3-9 215.302,129.488 R21.1@215.481,129.667
Net_J3-10: ?.J3-10 R24.1 | length 3.5
  Top Layer w0.254: ?.J3-10 214.042,126.948 214.498,126.492 R24.1
Net_J3-13: ?.J3-13 R25.1 | length 3.3
  Top Layer w0.254: ?.J3-13 215.81,119.328 R25.1
Net_J3-15: ?.J3-15 R26.1 | length 3.4
  Top Layer w0.254: ?.J3-15 215.937,114.248 R26.1
Net_J3-16: ?.J3-16 R27.1 | length 3.2
  Top Layer w0.254: ?.J3-16 215.66,111.708 R27.1@215.735,111.633
NetADC_9: ADC.9 C5.1 | length 2.2
  Top Layer w0.254: C5.1 201.098,84.328 201.246,84.179 201.246,84.177 201.438,83.985 202.213,83.985 ADC.9
NetC1_1: C1.1 D1.2 D3.1 R1.2 | length 10.3
  Top Layer w0.254: R1.2 149.009,153.643 150.628,155.262 151.106,155.262 C1.1 153.454,155.54 154.436,154.558 D3.1 D1.2
NetC1_2: C1.2 D2.2 D4.1 R2.2 | length 15.5
  Top Layer w0.254: R2.2 148.755,158.777 149.028,158.504 149.695,158.504 151.319,156.88 C1.2 151.449,156.88 153.954,159.385 156.596,159.385 158.119,157.862 D2.2 D4.1
NetC2_1: C2.1 D1.1 D2.1 R3.1 R4.1 R6.1 | length 19.5
  Top Layer w0.254: D1.1 D2.1 ; R3.1 160.782,158.749 159.067,160.464 159.067,160.714 158.619,161.162 D2.1 ; R4.1 168.364,161.517 167.968,161.913 R6.1 165.587,161.765 164.602,161.765 163.224,161.765 C2.1 158.689,161.482 D2.1
NetC2_2: C2.2 D5.2 Q1.2 R6.2 | length 9.4
  Top Layer w0.254: D5.2 162.941,158.113 C2.2 165.329,160.082 165.66,160.413 R6.2 165.81,160.413 166.108,160.115 166.108,160.04 167.198,158.95 Q1.2
NetD3_2: D3.2 D4.2 D5.1 Q1.1 R3.2 | length 18.9
  Top Layer w0.254: D3.2 D4.2 158.619,151.258 159.067,151.706 159.067,151.956 160.782,153.671 R3.2 162.056,155.448 163.072,154.432 D5.1 165.659,154.432 168.31,157.083 Q1.1
NetD6_2: D6.2 Q3.3 RELAY.COIL1 | length 44.4
  Top Layer w0.254: RELAY.COIL1 158.242,141.351 D6.2 156.845,132.842 v1(156.845,126.238) ; v1(156.845,120.523) 156.972,120.65 162.018,120.65 Q3.3
  Bottom Layer w0.254: v1(156.845,120.523) v1(156.845,126.238)
NetF5_2: F5.2 Supply.4 | length 6.5
  Top Layer w0.254: F5.2 185.087,57.956 Supply.4
NetOPTOCOUPLER1_1: OPTOCOUPLER1.1 R13.2 | length 1.8
  Top Layer w0.254: OPTOCOUPLER1.1 164.682,85.762 R13.2
NetOPTOCOUPLER1_6: OPTOCOUPLER1.6 R14.1 | length 3.3
  Top Layer w0.254: R14.1 155.023,85.749 155.38,86.106 OPTOCOUPLER1.6
NetOPTOCOUPLER2_1: OPTOCOUPLER2.1 R15.2 | length 1.9
  Top Layer w0.254: OPTOCOUPLER2.1 164.555,75.602 R15.2
NetOPTOCOUPLER2_6: OPTOCOUPLER2.6 R16.1 | length 3.5
  Top Layer w0.254: R16.1 154.953,75.45 155.322,75.819 OPTOCOUPLER2.6
NetOPTOCOUPLER3_1: OPTOCOUPLER3.1 R17.2 | length 1.9
  Top Layer w0.35: OPTOCOUPLER3.1 164.428,65.442 R17.2
NetOPTOCOUPLER3_6: OPTOCOUPLER3.6 R18.1 | length 3.1
  Top Layer w0.254: R18.1 153.658,65.659 OPTOCOUPLER3.6
NetOPTOCOUPLER4_1: OPTOCOUPLER4.1 R19.2 | length 1.9
  Top Layer w0.35: OPTOCOUPLER4.1 164.124,55.282 R19.2
NetOPTOCOUPLER4_6: OPTOCOUPLER4.6 R20.1 | length 3.1
  Top Layer w0.254: R20.1 153.608,55.322 OPTOCOUPLER4.6
NetQ1_3: Q1.3 Q2.2 | length 9.8
  Top Layer w0.254: Q2.2 163.322,149.733 163.322,151.041 167.364,155.083 Q1.3
NetQ2_1: Q2.1 R4.2 | length 16.2
  Top Layer w0.254: Q2.1 168.148,150.876 171.704,154.432 171.704,159.577 169.964,161.317 R4.2
NetQ3_1: Q3.1 R7.2 R8.2 | length 6.4
  Top Layer w0.254: Q3.1 166.112,119.822 167.094,120.804 R7.2 167.094,123.875 R8.2@167.017,123.952
Neutral: Neutral.1 Neutral.2 R2.1 | length 18.2
  Top Layer w0.6: R2.1 147.155,165.189 Neutral.2 Neutral.1
Phase: Phase.1 Phase.2 Phase.3 Phase.4 R1.1 R14.2 R16.2 R18.2 R20.2 RELAY.COM | length 123.1
  Top Layer w0.354: RELAY.COM 134.747,145.161 151.209,128.699 151.209,128.191 v1(151.384,128.016) ; v1(151.511,112.776) 151.511,89.206 ; R20.2 153.341,56.63 153.093,56.878 153.093,56.953 151.511,58.535 151.511,67.945 ; R16.2 153.341,76.95 152.567,77.724 151.511,77.724 ; R18.2 152.412,67.044 151.511,67.945 ; R14.2 153.468,87.249 151.511,89.206 ; 151.511,67.945 151.511,77.724 ; 151.511,77.724 151.511,89.206
  Top Layer w0.6: Phase.2 136.398,153.543 R1.1
  Bottom Layer w0.354: v1(151.384,128.016) 151.511,127.889 v1(151.511,112.776)
Phase_Out: "CURRENT SENSOR.3" "CURRENT SENSOR.4" TRIAC1.2 TRIAC2.2 TRIAC3.2 TRIAC4.2
Potentiometer: ?.J2-5 Supply.2 | length 100
  Top Layer w0.254: ?.J2-5 190.171,139.648 191.389,138.43 v1(191.389,136.271) ; Supply.2@191.008,51.768 191.008,57.404 188.214,60.198 188.214,94.615 197.231,103.632 197.231,120.523 193.802,123.952 v1(191.643,123.952)
  Top Layer w0.6: Supply.2@191.008,51.768 Supply.2
  Bottom Layer w0.254: v1(191.389,136.271) 191.516,136.144 191.516,124.079 v1(191.643,123.952)
RELAY_OUT: "CURRENT SENSOR.1" "CURRENT SENSOR.2" RELAY.NO
Relay_Trigger: R7.1 Supply.3 | length 84.7
  Top Layer w0.254: R7.1 168.694,120.804 168.794,120.904 173.393,120.904 178.308,115.989 178.308,55.267 183.029,50.546 186.944,50.546 Supply.3
RESET: ADC.4 R26.2 | length 48.9
  Top Layer w0.254: ADC.4@202.409,87.235 ADC.4 197.597,87.137 196.469,88.265 196.469,91.186 204.216,98.933 v1(204.216,112.014) ; v1(215.011,115.697) 216.292,115.697 217.589,114.4 R26.2
  Bottom Layer w0.254: v1(204.216,112.014) 207.883,115.681 214.995,115.681 v1(215.011,115.697)
SCL: ?.J3-3 LCD.2 | length 30.6
  Top Layer w0.254: LCD.2 198.549,158.777 ?.J3-3
SCLK: ADC.28 R21.2 Temp_Sens1.4 Temp_Sens2.4 Temp_Sens3.4 Temp_Sens4.4 | length 130.8
  Top Layer w0.254: ADC.28 208.187,126.78 209.462,128.055 215.95,128.055 217.462,129.567 R21.2 217.735,129.394 217.735,129.013 218.224,128.524 v1(219.456,128.524) ; v1(222.631,128.524) 224.165,128.524 Temp_Sens4.4 229.302,123.765 231.394,125.857 231.394,128.723 232.791,130.12 ; Temp_Sens3.4 231.648,109.852 v1(231.648,114.173) ; Temp_Sens2.4 232.093,144.335 ; Temp_Sens1.4 232.029,155.535 v1(232.029,151.003) ; v1(232.029,118.11) 232.791,118.872 232.791,130.12 ; v1(232.093,146.368) 232.093,144.335 ; v1(232.41,136.398) 232.41,144.018 232.093,144.335 ; v1(232.664,131.064) 232.791,130.937 232.791,130.12
  Bottom Layer w0.254: v1(219.456,128.524) v1(222.631,128.524) ; v1(231.648,114.173) 231.648,114.448 232.029,114.829 v1(232.029,118.11) ; v1(232.029,151.003) 232.093,150.939 v1(232.093,146.368) 232.093,146.093 v1@232.328,146.093 ; v1(232.41,136.398) 233.299,135.509 233.299,131.699 v1(232.664,131.064)
SDA: ?.J3-6 LCD.3 | length 41.3
  Top Layer w0.254: LCD.3 206.502,164.592 v1(206.502,153.797) ; v1(209.423,137.795) 209.486,137.795 210.173,137.108 ?.J3-6
  Bottom Layer w0.254: v1(206.502,153.797) 206.502,151.257 203.051,147.806 203.051,147.596 209.423,141.224 v1(209.423,137.795)
START: ADC.23 R27.2 | length 31.3
  Top Layer w0.254: ADC.23 208.285,85.935 209.76,85.935 218.44,94.615 218.44,110.782 217.962,111.26 217.862,111.26 217.589,111.533 R27.2
Thermocouple1+: R32.1 Thermo_1.1 | length 35.9
  Top Layer w0.254: R32.1 193.966,82.044 191.389,79.467 191.389,67.818 Thermo_1.1
Thermocouple1-: R33.1 Thermo_1.2 | length 32
  Top Layer w0.254: R33.1 194.003,67.704 Thermo_1.2
Thermocouple1_IN+: ADC.11 C7.1 C8.1 R32.2 | length 8.5
  Top Layer w0.254: R32.2 195.416,82.294 196.634,83.512 196.634,83.761 196.912,84.039 197.042,84.039 197.32,83.761 197.32,83.696 198.401,82.615 C7.1 199.291,82.587 ADC.11
Thermocouple1_IN-: ADC.12 C7.2 C9.1 R33.2 | length 10.2
  Top Layer w0.254: C9.1 195.834,78.869 195.453,79.25 R33.2 197.323,79.375 199.163,81.215 C7.2 200.351,81.215 201.073,81.937 ADC.12
Thermocouple2+: R34.1 Thermo_2.1 | length 11.5
  Top Layer w0.254: R34.1 227.685,81.026 227.731,80.98 228.342,80.98 Thermo_2.1
Thermocouple2-: R35.1 Thermo_2.2 | length 11.7
  Top Layer w0.254: R35.1 217.26,83.695 217.79,83.165 Thermo_2.2
Thermocouple2_IN+: ADC.17 C10.1 C11.1 R34.2 | length 10.8
  Top Layer w0.254: ADC.17 208.285,81.839 209.517,81.839 209.76,81.596 211.301,81.596 211.871,81.026 R34.2 215.81,79.119 216.065,78.864 216.065,78.799 216.343,78.521 C11.1
Thermocouple2_IN-: ADC.18 C10.2 C12.1 R35.2 | length 11
  Top Layer w0.254: ADC.18 209.564,82.587 209.973,82.996 C10.2 215.111,82.996 215.81,83.695 R35.2 215.81,83.945 216.373,84.508 C12.1
Thermocouple3+: R36.1 Thermo_3.1 | length 23
  Top Layer w0.254: R36.1 201.42,69.088 217.295,53.213 Thermo_3.1
Thermocouple3-: R37.1 Thermo_3.2 | length 21.9
  Top Layer w0.254: R37.1 205.484,68.871 205.682,68.673 205.682,68.548 219.863,54.367 219.863,53.528 Thermo_3.2
Thermocouple3_IN+: ADC.13 C13.1 C14.1 R36.2 | length 13.7
  Top Layer w0.254: R36.2 201.295,71.728 198.947,74.076 C14.1 198.882,76.365 200.687,78.17 C13.1 200.787,80.538 201.438,81.189 202.213,81.189 ADC.13
Thermocouple3_IN-: ADC.14 C13.2 C15.1 R37.2 | length 12.9
  Top Layer w0.254: C13.2 C13.2@200.887,76.77 ; ADC.14 202.311,78.194 C13.2@200.887,76.77 ; R37.2 205.234,70.321 205.036,70.519 205.036,70.644 202.657,73.023 C15.1 202.657,74.868 201.15,76.375 201.15,76.507 C13.2@200.887,76.77
Thermocouple4+: R38.1 Thermo_4.1 | length 20
  Top Layer w0.254: R38.1 210.945,71.919 216.276,66.588 Thermo_4.1
Thermocouple4-: R39.1 Thermo_4.2 | length 14.5
  Top Layer w0.254: R39.1 215.39,71.882 218.184,69.088 Thermo_4.2
Thermocouple4_IN+: ADC.15 C16.1 C17.1 R38.2 | length 9.5
  Top Layer w0.254: ADC.15 208.7,80.637 209.231,80.106 C16.1 209.231,78.005 208.315,77.089 C17.1 208.593,75.795 208.593,75.471 210.695,73.369 R38.2
Thermocouple4_IN-: ADC.16 C16.2 C18.1 R39.2 | length 11.4
  Top Layer w0.254: ADC.16 208.285,81.189 209.06,81.189 210.631,79.618 C16.2 210.894,77.842 210.894,77.68 212.309,76.265 C18.1 212.309,76.135 212.587,75.857 212.615,75.857 215.14,73.332 R39.2
Trigger1: OPTOCOUPLER1.4 TRIAC1.3 | length 48.7
  Top Layer w0.254: TRIAC1.3 125.356,103.184 128.711,103.184 v1(128.905,103.378) ; v1(153.924,82.423) 153.924,82.296 155.194,81.026 OPTOCOUPLER1.4
  Bottom Layer w0.254: v1(128.905,103.378) 129.921,102.362 146.812,102.362 148.336,100.838 148.336,87.757 153.67,82.423 v1(153.924,82.423)
Trigger2: OPTOCOUPLER2.4 TRIAC2.3 | length 42.4
  Top Layer w0.254: TRIAC2.3 127.963,87.63 v1(129.286,87.63) ; v1(153.162,72.644) 155.067,70.739 OPTOCOUPLER2.4
  Bottom Layer w0.254: v1(129.286,87.63) 130.305,88.649 140.975,88.649 147.828,81.796 147.828,77.978 v1(153.162,72.644)
Trigger3: OPTOCOUPLER3.4 TRIAC3.3 | length 38.2
  Top Layer w0.254: TRIAC3.3 128.076,68.439 128.076,69.148 v1(128.27,69.342) ; v1(153.67,62.484) 153.67,62.23 155.321,60.579 OPTOCOUPLER3.4
  Bottom Layer w0.254: v1(128.27,69.342) 129.688,70.76 145.394,70.76 v1(153.67,62.484)
Trigger4: OPTOCOUPLER4.4 TRIAC4.3 | length 34.6
  Top Layer w0.254: TRIAC4.3 131.519,52.705 148.59,52.705 151.053,50.242 OPTOCOUPLER4.4
"Zero Cross Detection": ?.J2-11 Q2.5 R5.2 | length 34.6
  Top Layer w0.254: Q2.5 176.784,143.891 176.784,128.016 180.937,123.863 R5.2 182.753,123.838 186.275,123.838 186.845,124.408 ?.J2-11
pads on no net: "CURRENT SENSOR.6" ?.J2-1 ?.J2-2 ?.J2-3 ?.J2-4 ?.J2-13 ?.J2-16 ?.J2-17 ?.J2-18 ?.J3-1 ?.J3-4 ?.J3-5 ?.J3-7 ?.J3-14 ?.J3-17 ?.J3-18 ?.J3-19 ADC.5 ADC.7 ADC.8 ADC.19 ADC.20 LCD.5 LCD.6 Load1.MH1 Load1.MH2 Load2.MH1 Load2.MH2 Load3.MH1 Load3.MH2 Load4.MH1 Load4.MH2 OPTOCOUPLER1.3 OPTOCOUPLER1.5 OPTOCOUPLER2.3 OPTOCOUPLER2.5 OPTOCOUPLER3.3 OPTOCOUPLER3.5 OPTOCOUPLER4.3 OPTOCOUPLER4.5 Q2.3 Q2.6 Supply.5 Supply.6 Temp_Sens1.MH1 Temp_Sens2.MH1 Temp_Sens3.MH1 Temp_Sens4.MH1 Thermo_1.3 Thermo_2.3 Thermo_3.3 Thermo_4.3

## Polygon pours and split planes (outlines as drawn)
Load1 on Top Layer "LOAD1_L01_P050" (solid, pour order 50): 143.637,96.012 143.637,100.076 129.286,100.076 129.286,98.933 124.079,98.933 124.079,96.774 129.286,96.774 129.286,96.012
Phase_Out on Top Layer "PHASE_OUT_L01_P055" (solid, pour order 55): 126.365,42.926 126.365,45.212 121.285,45.212 121.285,62.103 126.238,62.103 126.238,64.135 121.285,64.135 121.285,81.407 121.412,81.534 126.492,81.534 126.492,83.439 126.365,83.566 121.285,83.566 121.285,99.314 121.412,99.441 126.111,99.441 126.111,101.092 125.73,101.092 121.285,101.092 121.285,107.95 136.398,107.95 136.398,113.03 136.398,115.062 133.858,115.062 133.858,111.125 129.54,111.125 118.11,111.125 118.11,42.926